# Altium PCB PCB1.PcbDoc
Units mil, origin at the board's own origin, x right, y up, seen from the top; angles counter-clockwise.
Board outline 2398.65 x 1533.37 mil, 2 copper layers (Top Layer, Bottom Layer); 37 components, 23 nets, 95 pads, 16 vias.
Unrouted connection lines stored in the file: 1.
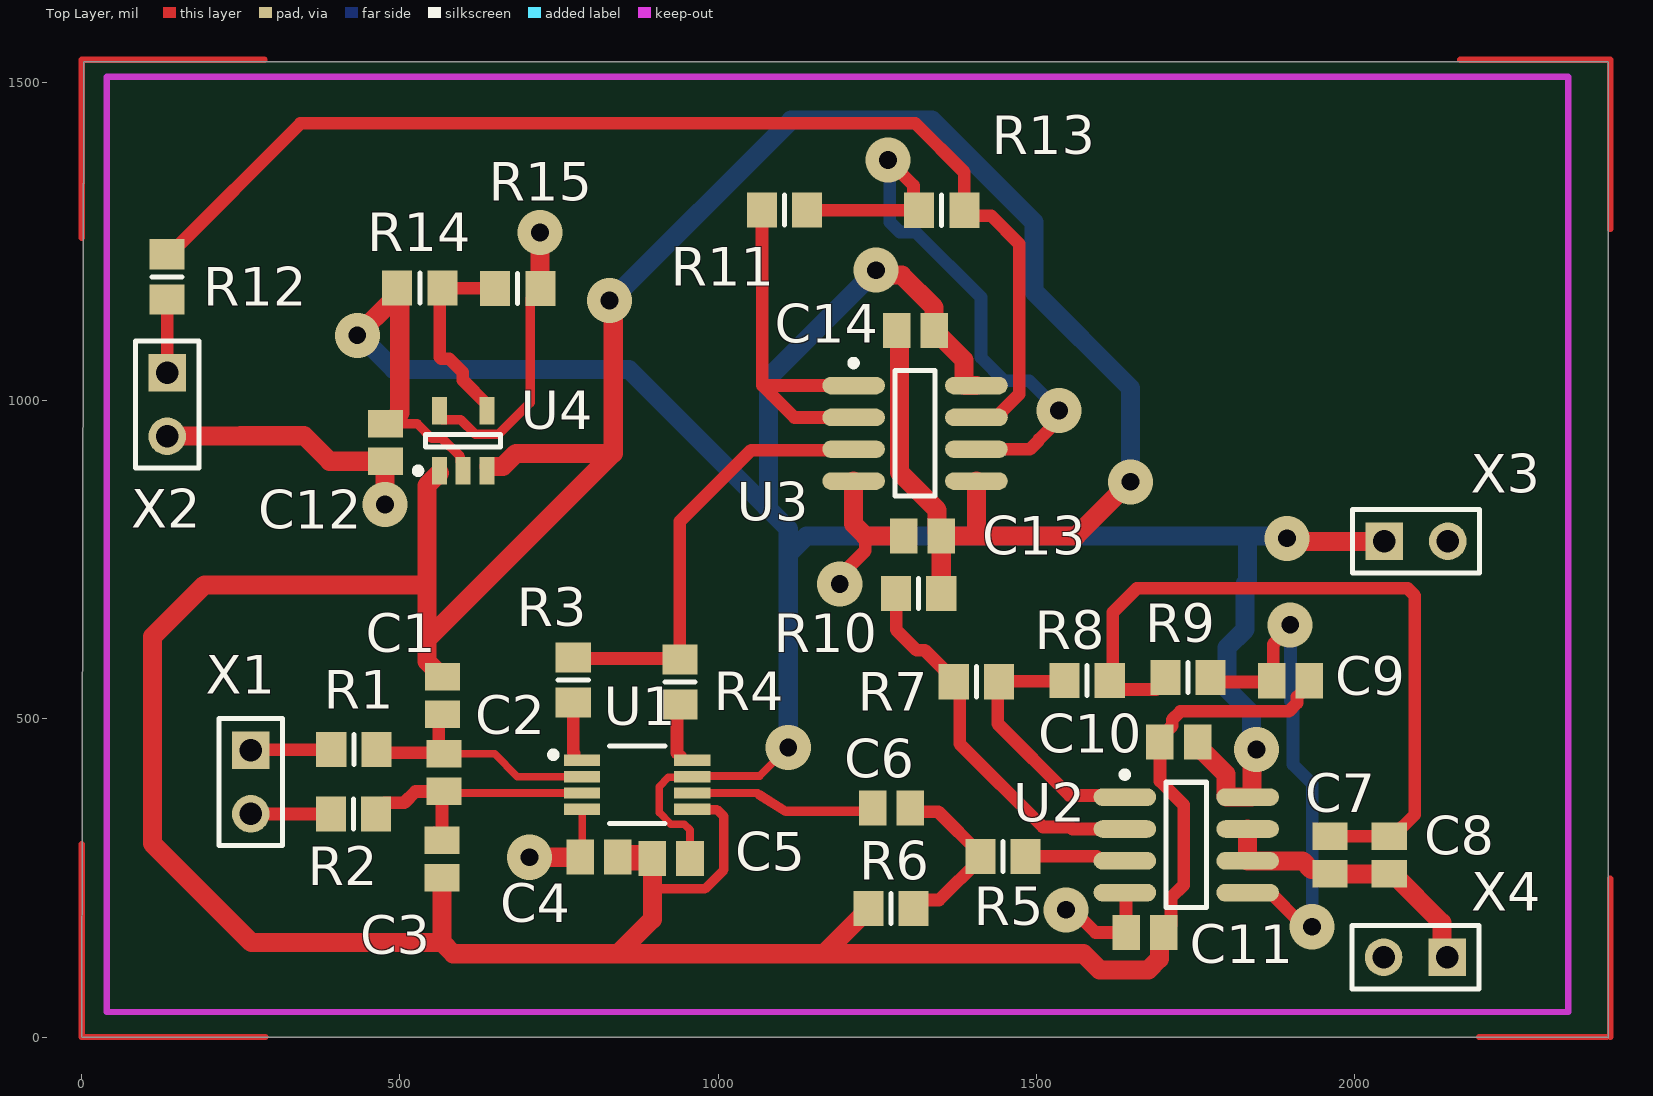
[diagram p0: Top Layer view]
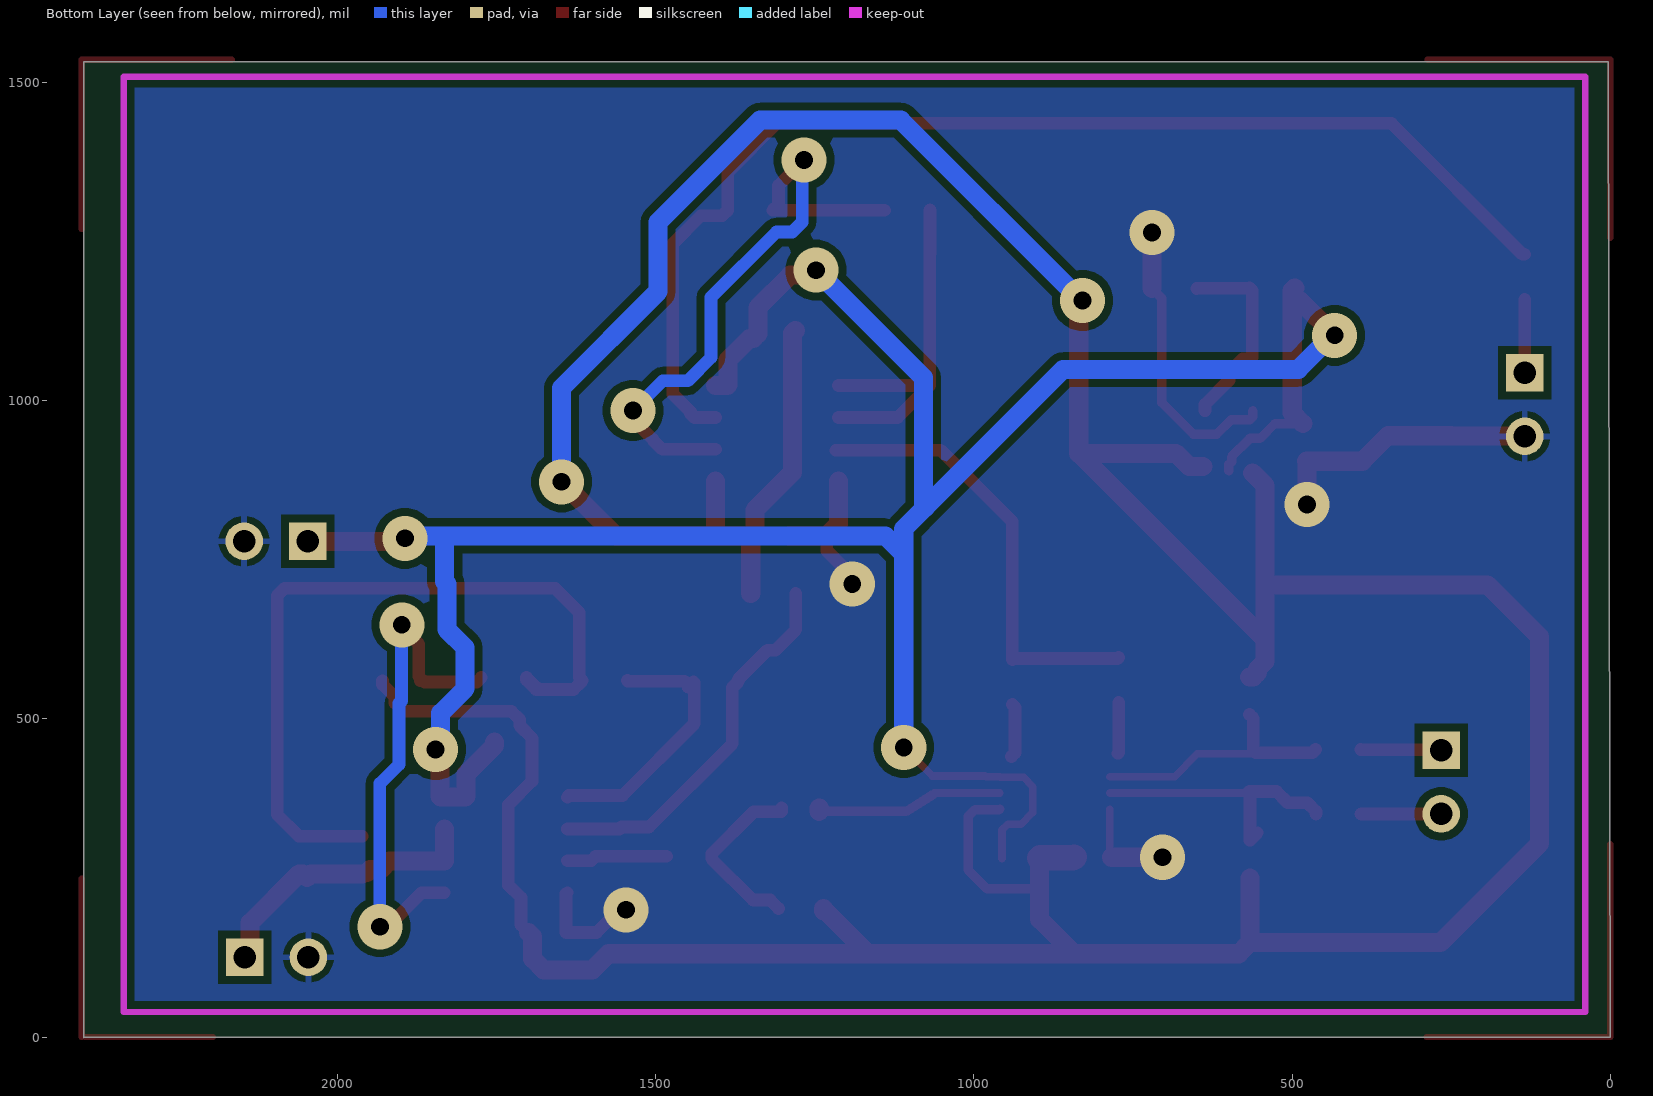
[diagram p1: Bottom Layer view, seen from below]

## Layer stack, top to bottom
Top Solder: solder mask 0.4, Solder Resist, Dk 3.5
Top Layer: signal copper 1.4
Dielectric 1: dielectric 12.6, FR-4, Dk 4.8
Bottom Layer: signal copper 1.4
Bottom Solder: solder mask 0.4, Solder Resist, Dk 3.5

## Board outline
3.05,1532.5 2398.65,1532.5 2398.65,-0.86 2397.78,0 0,0

## Design rules (kind name [scope] priority, off if disabled: settings)
Clearance Clearance_1 [All] p1: gap=12 ignorepadtopadclearanceinfootprint=TRUE except(8: Arc-SMDPad Track-SMDPad SMDPad-SMDPad)
HoleSize [All] p1: absolutevalues=TRUE maxlimit=125.98 minlimit=19.68 maxpercent=80.000 minpercent=20.000
MinimumSolderMaskSliver SolderMaskSMD [IsPad vs IsPad] p1: minsoldermaskwidth=6
MinimumSolderMaskSliver MinimumSolderMaskSliver_1 [All] p2: minsoldermaskwidth=10
PolygonConnect [All] p1: thpad.connectstyle=Relief thpad.reliefconductorwidth=10 thpad.reliefentries=4 thpad.polygonreliefangle="90 Angle" thpad.airgapwidth=10 smdpad.connectstyle=Relief smdpad.reliefconductorwidth=10 smdpad.reliefentries=4 smdpad.polygonreliefangle="90 Angle" smdpad.airgapwidth=10 via.connectstyle=Direct via.reliefconductorwidth=10 via.reliefentries=4 via.polygonreliefangle="90 Angle" via.airgapwidth=10
RoutingVias [All] p1: holewidth=28 width=50 viastyle="Through Hole" minholewidth=28 minwidth=50 maxholewidth=28 maxwidth=50
SilkToSilkClearance [HasFootprint('6-0805_N') vs HasFootprint('C0805')] p1: silktosilkclearance=10
SilkToSolderMaskClearance Silk_SMD [HasFootprint('6-0805_N')] p1: minsilkscreentomaskgap=7.87 clearancetoexposedcopper=TRUE
SilkToSolderMaskClearance [HasFootprint('No Footprint')] p2: minsilkscreentomaskgap=10 clearancetoexposedcopper=TRUE
SolderMaskExpansion [All] p1: expansion=4 istentingtop=FALSE
SupplyNets "Schematic Supply Nets_3" [InNet('GND')] p1: voltage=0.000
SupplyNets "Schematic Supply Nets_2" [InNet('3V3')] p2: voltage=0.000
SupplyNets "Schematic Supply Nets_1" [InNet('Vref')] p3: voltage=0.000
Width [All] p1: maxlimit=60 minlimit=10 preferedwidth=12
26 further rules are at their usual default settings.

## Classes and differential pairs
component class U_PogonDesneNoge: C12 C13 C14 R11 R12 R13 R14 R15 U3 U4 X2
component class U_Instr_pojacalo: C1 C2 C3 C4 C5 R1 R2 R3 R4 U1 X1
component class U_AntiAliasing_Bessel: C6 C7 C8 C9 C10 C11 R5 R6 R7 R8 R9 R10 U2 X3 X4

## Components (designator, comment, footprint, x,y, rotation, side; value= is the part's Value field where it differs from the comment)
C1 "100 pF" C0805 566.71,536.3 r90 top
C2 "1 nF" C0805 569.21,415.48 r90 top
C3 "100 pF" C0805 566.23,279.54 r90 top
C4 "X7R" C0805 812.99,282.48 r0 top value="100 nF"
C5 "X7R" C0805 926.18,280.51 r0 top value="100 nF"
C6 "47 nF" C0805 1272.3,359.82 r0 top
C7 "2.2 nF" C0805 1961.3,285.82 r90 top
C8 "820 pF" C0805 2054.3,285.82 r90 top
C9 "2.2 nF" C0805 1899.28,559.68 r180 top
C10 "X7R" C0805 1723.52,463.59 r0 top value="100 nF"
C11 "X7R" C0805 1670.28,164.37 r0 top value="100 nF"
C12 "X7R" C0805 477.09,934.09 r90 top value="100 nF"
C13 "X7R" C0805 1320.87,787.4 r0 top value="100 nF"
C14 "X7R" C0805 1310.1,1110.18 r0 top value="100 nF"
R1 "4.7k / 0.1%" 6-0805_N 427.58,451.8 r0 top
R2 "4.7k / 0.1%" 6-0805_N 427.1,350.54 r0 top
R3 "16.5k / 1%" 6-0805_N 772.26,560.94 r90 top
R4 "16.5k / 1%" 6-0805_N 939.71,557.78 r270 top
R5 "1k / 1%" 6-0805_N 1447.3,283.82 r0 top
R6 "680k / 1%" 6-0805_N 1271.3,201.82 r0 top
R7 "10k / 1%" 6-0805_N 1405.51,558.07 r0 top
R8 "82k / 1%" 6-0805_N 1579.72,560.04 r0 top
R9 "100 k/1%" 6-0805_N 1738.19,564.96 r0 top
R10 "1k/1%" 6-0805_N 1314.96,696.85 r180 top value="10k / 1%"
R11 "10k / 1%" 6-0805_N 1104.33,1299.21 r180 top
R12 "390k / 1%" 6-0805_N 134.37,1194.31 r90 top
R13 "390k / 1%" 6-0805_N 1351.19,1298.82 r0 top
R14 "470k / 1%" 6-0805_N 531.16,1176.91 r180 top
R15 "470k / 1%" 6-0805_N 685.08,1176.08 r180 top
U1 "INA333" FP-DGK0008A-MFG 872.77,396.21 r0 top
U2 "AD8542" ADI-R-8_M 1735.3,301.82 r0 top
U3 "AD8542" ADI-R-8_M 1309.23,948.41 r0 top
U4 "AD8541" ADI-RJ-5_N 599.3,936.82 r90 top
X1 "Header 2" HDR1X2 265.81,450.54 r270 top
X2 "Header 2" HDR1X2 134.37,1043.67 r270 top
X3 "Header 2" HDR1X2 2046.3,778.82 r0 top
X4 "Header 2" HDR1X2 2145.37,125.27 r180 top

## Footprints (in the part's own frame and the unit in brackets; to place one, negate y for a bottom-side part, rotate by r counter-clockwise, add the part's x,y. Pads: shape width x height; smd on the part's side, far side on the other; paste and mask are expansions set on the pad)
6-0805_N [mm] "Chip Resistor, Body 2.0x1.2mm, IPC Medium Density"
  rect 1.2x1.4 smd: 1(-0.9,0) 2(0.9,0)
  silkscreen extent 0,-0.6 0,0.6, body extent -1.07,-0.7 1.07,0.7, height 0.7
ADI-R-8_M [mm] "SOIC, 8-Leads, Body 4.9x3.9mm, Pitch 1.27mm, IPC Low Density"
  oval 2.5x0.7 smd: 1(-2.45,1.905) 2(-2.45,0.635) 3(-2.45,-0.635) 4(-2.45,-1.905) 5(2.45,-1.905) 6(2.45,-0.635) 7(2.45,0.635) 8(2.45,1.905)
  silkscreen extent -2.57,-2.5 0.8,2.93, body extent -2,-2.5 2,2.5, height 1.75
ADI-RJ-5_N [mm] "SOT-23, 5-Leads, Body 2.9x1.6mm, Pitch 0.95mm, IPC Medium Density"
  rect 1.1x0.6 smd: 1(-1.2,0.95) 2(-1.2,0) 3(-1.2,-0.95) 4(1.2,-0.95) 5(1.2,0.95)
  silkscreen extent -1.32,-1.5 0.25,1.92, body extent -0.85,-1.5 0.85,1.5, height 1.45
C0805 [mm] "Chip Capacitor, Body 2.0x1.3mm, IPC High Density"
  rect 1.1x1.4 smd: 1(-0.75,0) 2(0.75,0)
  body extent -1.1,-0.72 1.1,0.72, height 1.4
FP-DGK0008A-MFG [mm]
  rect 1.45x0.45 smd paste+0 mask+0: 1(-2.2,0.975) 2(-2.2,0.325) 3(-2.2,-0.325) 4(-2.2,-0.975) 5(2.2,-0.975) 6(2.2,-0.325) 7(2.2,0.325) 8(2.2,0.975)
  silkscreen extent -3.47,-1.55 1.1,1.55, body extent -3.03,-1.8 3.03,1.8, height 0.25
HDR1X2 [mm] "Connector; Header; 2 Position"
  rect 1.5x1.5 hole 0.9: 1(0,0)
  round 1.5 hole 0.9: 2(2.54,0)
  silkscreen extent -1.27,-1.27 3.81,1.27

## Part data
C1 C2 C3 C4 C5 C6 C7 C8 C9 C10 C11 C12 C13 C14: library part Cap, "Capacitor", Kućište=0805
  C1 C3: Cijena="0,10 €", Kataloški broj=GRM2165C1H101JA01D, Opis="Keramički kondenzator, 100 pF, 50V, C0G", Proizvođač="Murata Electronics"
  C2: Cijena="0,13 €", Kataloški broj=GRM2165C1H102JA01D, Opis="Keramički kondenzator, 1 nF, 50V, C0G", Proizvođač="Murata Electronics"
  C4 C5 C10 C11 C12 C13 C14: Cijena="0,28 €", Kataloški broj=GCM21BR71H104KA37L, Opis="Keramički kondenzator, 100 nF, 50V, X7R", Proizvođač="Murata Electronics"
  C6: Cijena="0,34 €", Kataloški broj=C0805C473M3GECAUTO7210, Opis="Keramički kondenzator, 47 nF, 25V, C0G", Proizvođač=KEMET
  C7 C9: Cijena="0,16 €", Kataloški broj=GRM2165C1H222JA01D, Opis="Keramički kondenzator, 2.2 nF, 50V, C0G", Proizvođač="Murata Electronics"
  C8: Cijena="0,18 €", Kataloški broj=GRM2165C1H821JA01D, Opis="Keramički kondenzator, 820 pF, 50V, C0G", Proizvođač="Murata Electronics"
R1 R2 R3 R4 R5 R6 R7 R8 R9 R10 R11 R12 R13 R14 R15: library part Res2, "Resistor", Kućište=0805
  R1 R2: Cijena="0,09 €", Kataloški broj=ERA-6AEB472V, Opis="Precizni otpornik, 4.7 k, 0.1%", Proizvođač=Panasonic
  R3 R4: Cijena="0,09 €", Kataloški broj=CRCW080516K5FKEA, Opis="Otpornik, 16.5 k, 1%", Proizvođač=Vishay
  R5: Cijena="0,09 €", Kataloški broj=CRCW08051K00FKEA, Opis="Otpornik, 1 k, 1%", Proizvođač=Vishay
  R6: Cijena="0,09 €", Kataloški broj=CRCW0805680KFKEA, Opis="Otpornik, 680 k, 1%", Proizvođač=Vishay
  R7 R10 R11: Cijena="0,09 €", Kataloški broj=CRCW080510K0FKEA, Opis="Otpornik, 10 k, 1%", Proizvođač=Vishay
  R8: Cijena="0,09 €", Kataloški broj=CRCW080582K0FKEA, Opis="Otpornik, 82 k, 1%", Proizvođač=Vishay
  R9: Cijena="0,10 €", Kataloški broj=CRCW0805100KFKEA, Opis="Otpornik, 100 k, 1%", Proizvođač=Vishay
  R12 R13: Cijena="0,09 €", Kataloški broj=CRCW0805390KFKEA, Opis="Otpornik, 390 k, 1%", Proizvođač=Vishay
  R14 R15: Cijena="0,09 €", Kataloški broj=CRCW0805470KFKEA, Opis="Otpornik, 470 k, 1%", Proizvođač=Vishay
U1: library part CMP-0944-00090-3, "IC INST AMP 1 CIRCUIT 8VSSOP", Cijena="4,87 €", Kataloški broj=INA333AIDGKT, Kućište=VSSOP-8, Opis="Instrumentacijsko pojačalo", Proizvođač="Texas Instruments"
U2 U3: library part CMP-0384-00597-1, "Double Channel RRIO Operational Amplifier, 1 MHz BW, 920 mV/us SR, Industrial, 8-pin SOIC (R-8), Tube", Cijena="1,31 €", Kataloški broj=AD8542ARZ, Kućište=SOIC-8, Opis="Dvostruko operacijsko pojačalo", Proizvođač="Analog Devices"
U4: library part CMP-0384-01498-2, "Single Channel RRIO Operational Amplifier, 1 MHz BW, 920 mV/us SR, Industrial, 5-pin SOT23 (RJ-5), Reel", Cijena="1,83 €", Kataloški broj=AD8541ARTZ-REEL7, Kućište=SOT-23-5, Opis="Operacijsko pojačalo", Proizvođač="Analog Devices"
X1 X3 X4: "Header, 2-Pin", Cijena="0,34 €", Kataloški broj=90120-0122, Kućište="THT Pin Header 2.54mm", Opis="Muški konektor 1x2, 2.54mm", Proizvođač=Molex
X2: library part CMP-002-00141-1, "Header, 2-Pin", Cijena="0,34 €", Kataloški broj=90120-0122, Kućište="THT Pin Header 2.54mm", Opis="Muški konektor 1x2, 2.54mm", Proizvođač=Molex

## Via types
v1: diameter 70.87, hole 28, Top Layer to Bottom Layer, 16 vias

## Nets (pads, with @x,y where several pads share a name; then routed paths per layer and width w, separated by ;. In a path a pad name is that pad's centre, name@x,y a point inside that pad or via, vN(x,y) a via of type N, cw(c..) or ccw(c..) an arc to the next point about the centre after c; other vN are vias at no path point)
3V3: C5.2 C10.2 C12.2 C14.2 R14.2 U1.7 U2.8 U3.8 U4.2 X3.1 | length 4245
  Top Layer w12: C5.2 955.71,325.27 946.76,334.22 925.79,334.22 907.19,352.82 907.19,393.41 921.66,407.88 958.26,407.88 U1.7 980.79,409.01 981.93,410.15 1065.15,410.15 v1(1110,455)
  Top Layer w15: C12.2 483,963.62 483.19,963.42 527.15,963.42 550.04,940.54 566.32,940.54 594.99,911.87 594.99,903.73 599.3,899.42 U4.2
  Top Layer w30: v1(433.07,1102.36) R14.2@487.11,1156.4 ; C12.2@483,963.62 499.7,980.32 499.7,1172.94 R14.2 ; v1(1248.03,1204.72) 1255.85,1196.91 1288.48,1196.91 1339.21,1146.17 1339.21,1104.69 1346.28,1097.62 1352.18,1097.62 1385.9,1063.91 1385.9,1024.63 1387.12,1023.41 U3.8 ; C10.2 1753.05,457.77 1797.54,413.28 1797.54,378.04 1798.76,376.82 U2.8 1837.39,376.82 1838.61,378.04 1838.61,444.91 v1(1845.47,451.77) ; v1(1893.7,783.46) 1898.52,778.64 2036.48,778.64 X3.1@2041.3,773.82
  Bottom Layer w30: v1(433.07,1102.36) 436.68,1102.36 490.22,1048.82 859.49,1048.82 1076.3,832.01 ; v1(1110,455) 1110,758.53 ; v1(1248.03,1204.72) 1079.3,1035.99 1079.3,835.01 1076.3,832.01 ; v1(1845.47,451.77) 1837.65,459.59 1837.65,508.76 1799.21,547.21 1799.21,611.55 1827.57,639.9 1827.57,711.8 1831.27,715.5 1831.27,787.4 ; v1(1893.7,783.46) 1889.76,787.4 1831.27,787.4 ; 1076.3,832.01 1110,798.31 1110,758.53 ; 1110,758.53 1138.87,787.4 1831.27,787.4
GND: C4.1 C11.1 C12.1 C13.1 R15.1 U1.4 U2.4 U3.4 U4.5 X2.2 X3.2 X4.2 | length 1478.3
  Top Layer w12: C4.1@783.42,282.44 786.16,285.17 U1.4
  Top Layer w15: C12.1 C12.1@482.75,910.22 ; U4.5 561.9,974.22 566.21,969.91 595.47,969.91 618.47,946.91 654.93,946.91 704.39,996.36 704.39,1160.25 R15.1@720.36,1176.23
  Top Layer w20: v1(1190.94,711.61) 1190.94,723.89 1231.07,764.02 1231.07,787.4 ; v1(1546.26,199.8) 1557.25,199.8 1592.68,164.37 C11.1 1640.75,224.91 U2.4
  Top Layer w30: X2.2 134.85,944.16 248.91,944.16 249.4,944.65 349.47,944.65 389.56,904.56 C12.1 476.74,904.2 476.74,836.97 v1(476.38,836.61) ; v1(703.74,282.48) C4.1 ; v1(720.21,1263.98) 720.36,1263.84 R15.1@720.36,1176.23 ; U3.4 1212.77,805.7 1231.07,787.4 C13.1 ; X4.2@2039.05,118.96 X4.2
NetC1_1: C1.1 C2.2 R1.2 U1.2 | length 397.9
  Top Layer w12: C2.2@560.8,450.06 565.98,444.88 648.62,444.88 684.5,409.01 U1.2
  Top Layer w20: R1.2 468.35,446.47 C2.2@557.21,446.47 ; C2.2@560.8,450.06 560.8,500.86 C1.1
NetC2_1: C2.1 C3.2 R2.2 U1.3 | length 429.3
  Top Layer w12: C2.1@569.32,383.42 U1.3
  Top Layer w20: R2.2 462.54,354.47 476.16,368.09 506.87,368.09 524.61,385.83 566.91,385.83 C2.1@569.32,383.42 ; C3.2@554.57,320.72 C3.2 C2.1@566.23,380.32
NetC6_1: C6.1 U1.6 | length 298.4
  Top Layer w12: U1.6 1062.02,383.42 1064.75,380.68
  Top Layer w15: 1064.75,380.68 1105.92,354.33 C6.1@1243.28,354.33
  Top Layer w30: C6.1 1242.77,354.84 C6.1@1243.28,354.33
NetC6_2: C6.2 R5.1 R6.2 | length 288.2
  Top Layer w20: C6.2 1301.83,354.82 1302.83,353.82 1345.8,353.82 1411.87,287.76 1411.87,279.88 1347.07,215.09 1320,215.09 R6.2
NetC7_2: C7.2 C8.2 R8.2 R9.1 | length 1223.9
  Top Layer w20: C7.2 2060.2,315.35 2094.49,349.63 2094.49,693.28 2082.77,705 1658,705 1619.89,666.89 1619.89,564.77 R8.2 1615.16,559.7 1628.78,546.08 R9.1@1687.82,546.08 ; R9.1@1687.82,546.08 1687.82,550.02 R9.1 1702.76,561.02 R9.1@1687.82,546.08
NetC9_2: C9.2 R9.2 U2.5 | length 803.7
  Top Layer w20: R9.2 1780.72,557.86 1862.65,557.86 1864.47,559.68 C9.2 ; U2.5 1867.19,226.82 1915.04,178.97 1927.33,178.97 v1(1933.07,173.23) ; C9.2@1872.08,566.78 1872.08,617.24 1898.62,643.78 v1(1898.62,647.57)
  Bottom Layer w20: v1(1898.62,647.57) 1899.28,646.91 1899.28,527.99 1902.91,524.37 1902.91,428.3 1933.07,398.13 v1(1933.07,173.23)
NetR1_1: R1.1 X1.1 | length 126.9
  Top Layer w20: X1.1 266.45,451.17 391.52,451.17 R1.1
NetR2_1: R2.1 X1.2 | length 125.9
  Top Layer w20: X1.2 R2.1
NetR3_1: R3.1 U1.1 | length 80.3
  Top Layer w20: R3.1 772.26,447.09 773.61,445.74
NetR3_2: R3.2 R4.1 U3.3 | length 706.7
  Top Layer w20: R3.2 773.84,594.8 R4.1@938.13,594.8 ; R4.1 939.71,809.71 1051.96,921.96 U3.3@1216.85,921.96
NetR4_2: R4.2 U1.8 | length 85.7
  Top Layer w20: R4.2 935.3,517.93 935.3,446.31 U1.8@940.84,440.77
NetR5_2: R5.2 U2.3 | length 159
  Top Layer w20: R5.2 1594.36,283.82 1601.36,276.82 U2.3
NetR7_1: R7.1 R10.2 U2.2 | length 599.9
  Top Layer w20: R10.2 1279.53,639.76 1311.77,607.52 1324.57,607.52 1370.08,562.01 R7.1 1379.57,548.58 1379.57,460.55 1510.19,329.93 1553.5,329.93 1556.61,326.82 U2.2
NetR7_2: R7.2 R8.1 U2.1 | length 415.7
  Top Layer w20: R7.2 1439.08,556.21 1439.08,492.09 1551.88,379.29 1636.37,379.29 U2.1 ; R7.2@1448.99,550.03 1448.99,553.47 1454.57,559.06 1543.31,559.06 R8.1
NetR11_1: R11.1 R13.1 U3.6 | length 981.3
  Top Layer w20: R11.1@1140.16,1298.82 R13.1 1306.94,1307.64 1306.94,1337.75 v1(1266.73,1377.95) ; U3.6 1489.6,923.41 1503.74,937.55 1503.74,938.79 1535.43,970.49 v1(1535.43,984.25)
  Bottom Layer w20: v1(1266.73,1377.95) 1269.58,1375.11 1269.58,1280.55 1285.31,1264.82 1309.98,1264.82 1412.7,1162.1 1412.7,1067.61 1449.52,1030.8 1488.89,1030.8 v1(1535.43,984.25)
NetR11_2: R11.2 U3.1 U3.2 | length 583
  Top Layer w20: R11.2 1068.9,1230.31 1069.02,1230.19 1069.02,1024.1 1083.87,1009.25 1119.71,973.41 U3.2 ; 1069.71,1023.41 U3.1
NetR12_1: R12.1 X2.1 | length 115.2
  Top Layer w20: X2.1 R12.1
NetR12_2: R12.2 R13.2 U3.7 | length 1857.1
  Top Layer w20: R12.2 138.3,1229.74 343.95,1435.39 1309.73,1435.39 1386.62,1358.5 R13.2 1395.06,1290.38 1428.53,1290.38 1472.9,1246.01 1472.9,1010.25 1444.9,982.25 1444.9,979.23 1439.07,973.41 U3.7
NetR14_1: R14.1 R15.2 U4.3 U4.4 | length 316
  Top Layer w20: U4.4 636.7,993.91 598.9,1031.71 598.9,1044.04 577.22,1065.72 564.89,1065.72 562.39,1068.22 562.39,1172.7 R14.1 567.01,1176.5 649.23,1176.5 R15.2
Vout: C7.1 C8.1 U2.6 U2.7 X4.1 | length 439.9
  Top Layer w30: U2.7 U2.6 1918.09,276.82 1931.96,262.94 1948.74,262.94 C7.1@1953.12,258.56 ; C7.1 2041.74,256.29 C8.1@2047.65,250.39 ; C8.1 2060.2,256.29 2136.95,179.55 2136.95,133.68 X4.1
Vref: C1.2 C3.1 C4.2 C5.1 C9.1 C10.1 C11.2 C13.2 C14.1 R6.1 R10.1 U1.5 U3.5 U4.1 | length 7204.5
  Top Layer w15: 896.65,232.78 979.11,232.78 1008.86,262.53 1008.86,346.46 998.05,357.27 959.94,357.27 U1.5
  Top Layer w20: C11.2 1711.46,176.02 1711.46,219.06 1731.37,238.97 1731.37,364.67 1694.08,401.96 1694.08,463.51 C10.1 1694,469.5 1713.4,488.9 1713.4,498.61 1726.43,511.63 1896.38,511.63 1909.41,524.66 1909.41,534.37 1928.81,553.77 C9.1
  Top Layer w30: U4.1@561.9,886.11 542.3,866.51 542.3,710.22 ; C3.1 566.23,148.43 ; C1.2 560.8,565.82 554.15,572.48 554.15,578.38 542.3,590.23 542.3,624.12 ; 639.89,896.23 661.55,896.23 682.32,916.99 835.18,916.99 ; v1(829.04,1157.07) 835.18,1150.93 835.18,916.99 ; C5.1 896.65,232.78 896.65,185.04 842.47,130.85 ; R6.1@1235.87,197.88 R6.1@1235.87,200.64 ; R6.1 R6.1@1235.87,200.64 ; C14.1 1284.99,1105.76 1284.99,886.85 1343.75,828.09 1343.75,794.06 C13.2 ; R10.1 C13.2 ; U3.5 1405.69,787.4 ; v1(1647.5,872.19) 1562.71,787.4 1405.69,787.4 ; C11.2 1693.15,157.72 1693.15,122.89 1675.58,105.32 1599.41,105.32 1573.87,130.85 1166.08,130.85 ; 542.3,624.12 835.18,916.99 ; 542.3,624.12 542.3,710.22 ; 542.3,710.22 192.7,710.22 111.3,628.82 111.3,303.82 266.69,148.43 566.23,148.43 ; 566.23,148.43 583.8,130.85 842.47,130.85 ; 842.47,130.85 1166.08,130.85 ; 1166.08,130.85 R6.1@1235.87,200.64 ; C13.2 1405.69,787.4
  Top Layer w40: C4.2 843.5,281.5 895.67,281.5 C5.1
  Bottom Layer w30: v1(829.04,1157.07) 831.25,1157.07 1114.57,1440.39 1335.86,1440.39 1496.06,1280.18 1496.06,1171.26 1647.5,1019.83 v1(1647.5,872.19)
copper on no net: | length 2108.3
  Top Layer w10: 0,302.59 0,0 288.29,0 ; 0.12,1255.52 0.12,1535.43 287.29,1535.43 ; 2165.67,1535.43 2401.57,1535.43 2401.57,1269.4 ; 2195.73,0 2395.72,0 ; 2401.57,0 2401.57,248.45

## Polygon pours and split planes (outlines as drawn)
GND on Bottom Layer "GND" (solid, remove dead copper, pour order 0): 22.09,1515.88 2318.02,1515.88 2318.02,53.33 2311.12,46.43 22.09,46.43

## Keep-outs
Keep-Out Layer:
  lines w10: 39.37,39.37 2335.3,39.37 2335.3,1508.82 39.37,1508.82 39.37,39.37

## Silkscreen, mask and mechanical layers (free items; w line width, h text height)
Mechanical 1:
  lines w10: -1.97,0 2401.57,0 2401.57,1535.43 -1.97,1535.43 -1.97,0

## Dimensions
2401.57,1535.43 to 2401.57,0 on Mechanical 1
-1.97,0 to 2401.57,1535.43 on Mechanical 1